# Altium PCB LSS-P-PCB-T v3.5.PcbDoc (part 3 of 5)
Units mil, origin at the board's own origin, x right, y up, seen from the top; angles counter-clockwise.
Board outline 2795.28 x 2795.28 mil, 4 copper layers (Top Layer, Power, Ground, Bottom Layer), stack 62.08 mil thick; 167 components, 123 nets, 589 pads, 650 vias.
Unrouted connection lines stored in the file: 2.
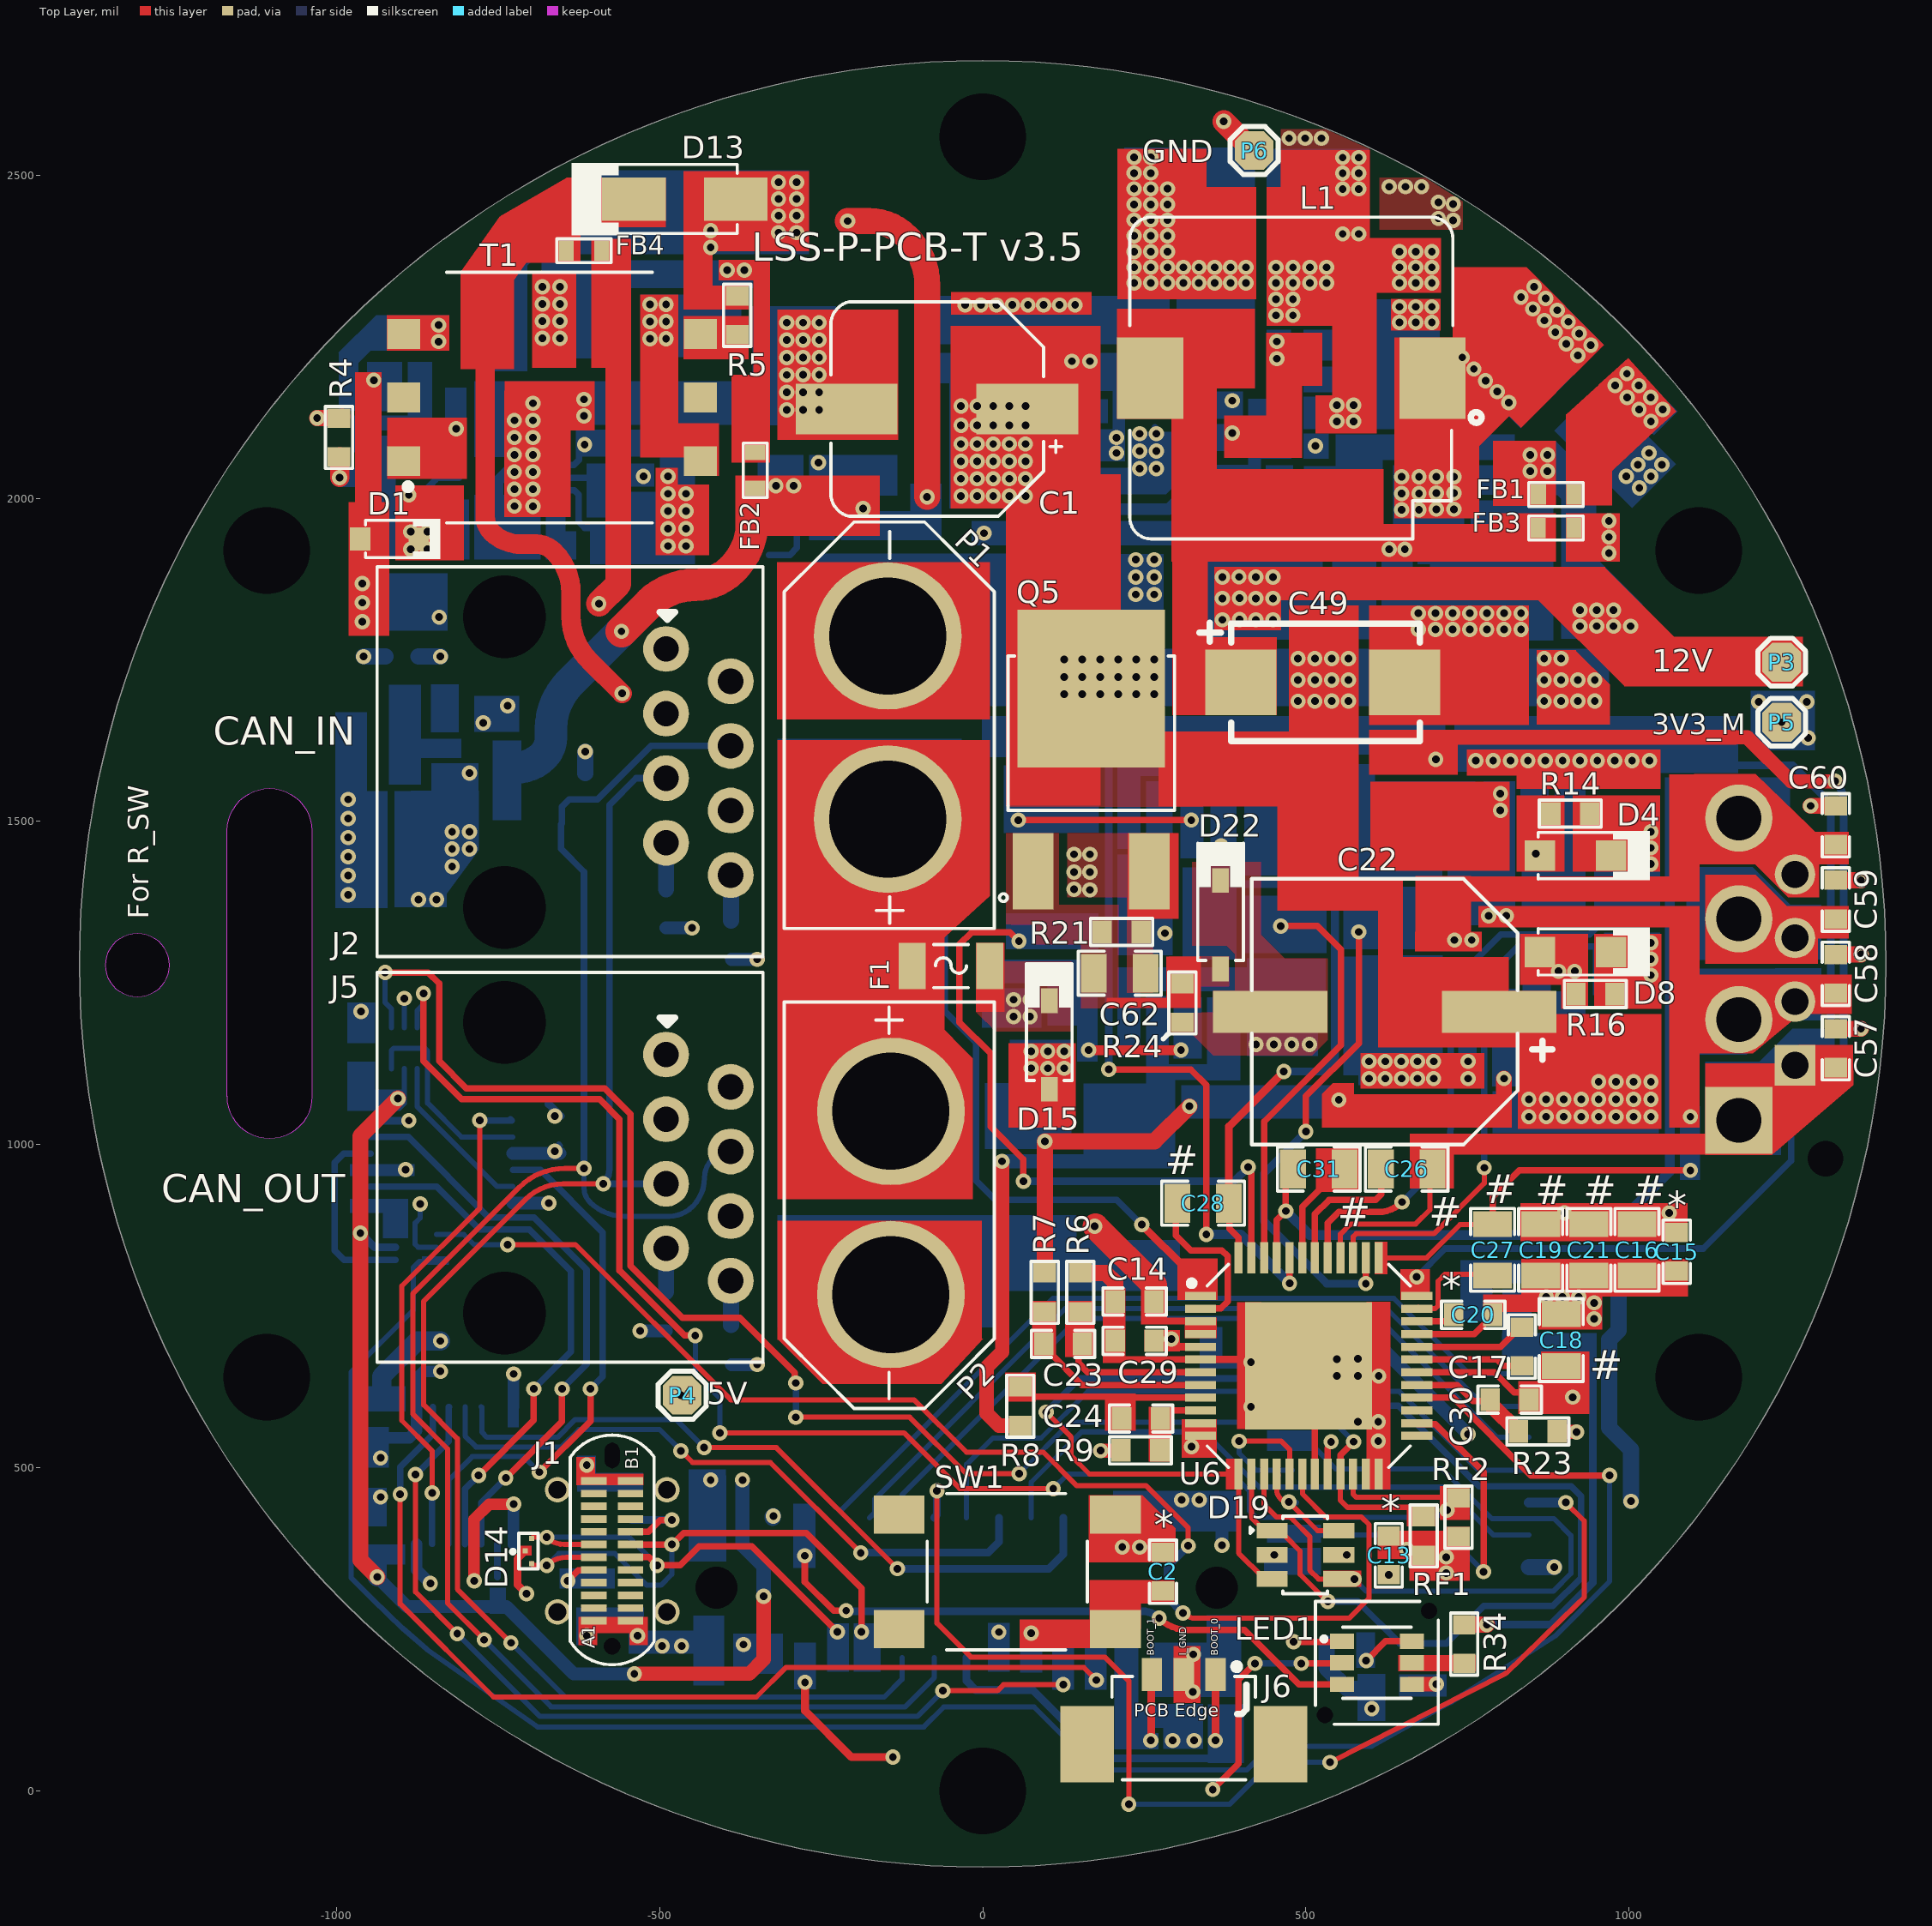
[diagram p0: Top Layer view]

## Part data (continued)
R3: library part RC0603FR-073K9L, "Res 0603 3.9K Ohm 1% 0.1W(1/10W) ±100ppm/°C Pad SMD T/R", Case Code (Imperial)=0603, Case Code (Metric)=1608, Manufacturer=Yageo, Max Operating Temperature=155°C, Max Power Dissipation=100mW, Min Operating Temperature=-55°C, Package Quantity=1, Resistance=3.9kR, Resistance Tolerance=1%, Resistor Type="Thick Film", Supplier Part Number 1=1995566P, Temperature Coefficient=100ppm/°C, Voltage Rating=50V, Case/Package=0603, Category="Chip SMD Resistors", ComponentLink1Description=https://datasheet.ciiva.com/11819/0900766b80f96399-11819346.pdf?src-supplier=RSComponents, ComponentLink1URL=https://datasheet.ciiva.com/11819/0900766b80f96399-11819346.pdf?src-supplier=RSComponents, ComponentLink2Description=https://datasheet.ciiva.com/2455/pyu-r-int-thick-7-2455362.pdf?src-supplier=Digi-Key, ComponentLink2URL=https://datasheet.ciiva.com/2455/pyu-r-int-thick-7-2455362.pdf?src-supplier=Digi-Key, ComponentLink3Description=https://datasheet.ciiva.com/2455/pyu-r-int-thick-7-2455363.pdf?src-supplier=Digi-Key, ComponentLink3URL=https://datasheet.ciiva.com/2455/pyu-r-int-thick-7-2455363.pdf?src-supplier=Digi-Key, ComponentLink4Description=https://datasheet.ciiva.com/2455/pyu-r-int-thick-7-2455364.pdf?src-supplier=Digi-Key, ComponentLink4URL=https://datasheet.ciiva.com/2455/pyu-r-int-thick-7-2455364.pdf?src-supplier=Digi-Key, ComponentLink5Description=https://datasheet.ciiva.com/7983/443971-7983640.pdf?src-supplier=Element14, ComponentLink5URL=https://datasheet.ciiva.com/7983/443971-7983640.pdf?src-supplier=Element14, ComponentLink6Description=https://datasheet.ciiva.com/12558/rc0603-272842-12558649.pdf?src-supplier=Mouser, ComponentLink6URL=https://datasheet.ciiva.com/12558/rc0603-272842-12558649.pdf?src-supplier=Mouser, ComponentLink7Description=https://datasheet.ciiva.com/7746/443971-7746347.pdf?src-supplier=Element14, ComponentLink7URL=https://datasheet.ciiva.com/7746/443971-7746347.pdf?src-supplier=Element14, ComponentLink8Description=https://datasheet.ciiva.com/7746/443971-7746348.pdf?src-supplier=Element14, ComponentLink8URL=https://datasheet.ciiva.com/7746/443971-7746348.pdf?src-supplier=Element14, ComponentLink9Description=https://datasheet.ciiva.com/15189/getdatasheetpartid-323794-15189725.pdf?src-supplier=Verical, ComponentLink9URL=https://datasheet.ciiva.com/15189/getdatasheetpartid-323794-15189725.pdf?src-supplier=Verical, Construction=Rectangular, Depth=0.8mm, Features="Moisture Resistant", Height=0.45mm, Lead Free="Lead Free", Length=1.6mm, Manufacturer Part Number=RC0603FR-073K9L, Military Standard=Not, Number of Pins=2, Number of Terminations=2, Packaging="Tape and Reel", Power Rating=100mW, Pricing 1="500=0.00600, 1000=0.00500, 2500=0.00500, 5000=0.00400 (GBP)", REACH SVHC="No SVHC", RoHS=Yes, RoHS Compliant=Yes, Series=RC, Size Code=0603, Stock 1=100, Supplier 1=RSComponents, Technology="THICK FILM", Termination=SMD/SMT, Tolerance=1%, Voltage Rating (DC)=50V, Width=0.8mm
R4: library part RS-03K7871FT, "100mW 50V ±1% ±100ppm/℃ -55℃~+155℃ 7.87kΩ 0603 Chip Resistor - Surface Mount ROHS", Manufacturer=FH, ComponentLink1Description=LCSC, ComponentLink1URL=https://lcsc.com/product-detail/Chip-span-style-background-color-ff0-Resistor-span-Surface-Mount_FH-Guangdong-Fenghua-Advanced-Tech-RS-03K7871FT_C322001.html, Manufacturer Part Number=RS-03K7871FT
R5 R11 R22 R25 R27 R32: library part RC0603FR-070RL, "RES SMD 0R, 1%, 0.1W, 0603", Case Code (Imperial)=0603, Case Code (Metric)=1608, Current Rating=1A, Manufacturer=Yageo, Max Operating Temperature=155°C, Max Power Dissipation=100mW, Min Operating Temperature=-55°C, Package Quantity=5000, Resistance=0mR, Resistor Type="Thick Film", Temperature Coefficient=200ppm/°C, Tolerance=1%, Voltage Rating=50V, Working Voltage=75V, Case/Package=0603, Category="Chip SMD Resistors", ComponentLink1Description=https://datasheet.ciiva.com/11808/0900766b80f96399-11808172.pdf?src-supplier=RSComponents, ComponentLink1URL=https://datasheet.ciiva.com/11808/0900766b80f96399-11808172.pdf?src-supplier=RSComponents, ComponentLink2Description=https://datasheet.ciiva.com/5558/rc0603-272842-5558341.pdf?src-supplier=Mouser, ComponentLink2URL=https://datasheet.ciiva.com/5558/rc0603-272842-5558341.pdf?src-supplier=Mouser, ComponentLink3Description=https://datasheet.ciiva.com/46382/443971-46382072.pdf?src-supplier=Element14, ComponentLink3URL=https://datasheet.ciiva.com/46382/443971-46382072.pdf?src-supplier=Element14, ComponentLink4Description=https://datasheet.ciiva.com/29721/pyu-r-int-thick-7-29721178.pdf?src-supplier=Digi-Key, ComponentLink4URL=https://datasheet.ciiva.com/29721/pyu-r-int-thick-7-29721178.pdf?src-supplier=Digi-Key, ComponentLink5Description=https://datasheet.ciiva.com/5684/443971-5684699.pdf?src-supplier=Farnell, ComponentLink5URL=https://datasheet.ciiva.com/5684/443971-5684699.pdf?src-supplier=Farnell, ComponentLink6Description=https://datasheet.ciiva.com/7983/443971-7983627.pdf?src-supplier=Element14, ComponentLink6URL=https://datasheet.ciiva.com/7983/443971-7983627.pdf?src-supplier=Element14, ComponentLink7Description=https://datasheet.ciiva.com/29721/pyu-rc0603-51-rohs-l-4-29721179.pdf?src-supplier=Digi-Key, ComponentLink7URL=https://datasheet.ciiva.com/29721/pyu-rc0603-51-rohs-l-4-29721179.pdf?src-supplier=Digi-Key, ComponentLink8Description=https://datasheet.ciiva.com/22643/1868787-22643388.pdf?src-supplier=Element14, ComponentLink8URL=https://datasheet.ciiva.com/22643/1868787-22643388.pdf?src-supplier=Element14, Contact Plating=Tin,Matte, Depth=0.8mm, Features="Moisture Resistant", Height=0.45mm, Lead Free="Lead Free", Length=1.6mm, Manufacturer Part Number=RC0603FR-070RL, Military Standard=Not, Number of Pins=2, Number of Terminations=2, Packaging="Tape and Reel", Power Rating=100mW, Pricing 1="5000=0.00320, 5000=0.00490, 50000=0.00450, 500000=0.00250, 2500000=0.00150 (USD)", Radiation Hardening=No, REACH SVHC="No SVHC", RoHS=Yes, Stock 1=1270000, Supplier 1="Arrow Electronics", Supplier Part Number 1=RC0603FR-070RL, Termination=SMD/SMT, Voltage Rating (DC)=50V, Width=0.031inch
R6 R7 R8 R9: library part RC0603FR-0747RL, "RES SMD 47OHM 0.1W 0603", Case Code (Imperial)=0603, Case Code (Metric)=1608, Manufacturer=Yageo, Max Operating Temperature=155°C, Max Power Dissipation=100mW, Min Operating Temperature=-55°C, Package Quantity=1, Resistance Tolerance=1%, Resistor Type="Thick Film", Supplier Part Number 1=311-47.0HRCT-ND, Temperature Coefficient=100ppm/°C, Voltage Rating=75V, Voltage Rating (DC)=50V, Case/Package=0603, Category="Chip SMD Resistors", ComponentLink1Description=https://datasheet.ciiva.com/2453/pyu-r-int-thick-7-2453922.pdf?src-supplier=Digi-Key, ComponentLink1URL=https://datasheet.ciiva.com/2453/pyu-r-int-thick-7-2453922.pdf?src-supplier=Digi-Key, ComponentLink2Description=https://datasheet.ciiva.com/2453/pyu-r-int-thick-7-2453923.pdf?src-supplier=Digi-Key, ComponentLink2URL=https://datasheet.ciiva.com/2453/pyu-r-int-thick-7-2453923.pdf?src-supplier=Digi-Key, ComponentLink3Description=https://datasheet.ciiva.com/2453/pyu-r-int-thick-7-2453924.pdf?src-supplier=Digi-Key, ComponentLink3URL=https://datasheet.ciiva.com/2453/pyu-r-int-thick-7-2453924.pdf?src-supplier=Digi-Key, ComponentLink4Description=https://datasheet.ciiva.com/7746/443971-7746363.pdf?src-supplier=Element14, ComponentLink4URL=https://datasheet.ciiva.com/7746/443971-7746363.pdf?src-supplier=Element14, ComponentLink5Description=https://datasheet.ciiva.com/7746/443971-7746364.pdf?src-supplier=Element14, ComponentLink5URL=https://datasheet.ciiva.com/7746/443971-7746364.pdf?src-supplier=Element14, ComponentLink6Description=https://datasheet.ciiva.com/46440/1868787-46440908.pdf?src-supplier=Element14, ComponentLink6URL=https://datasheet.ciiva.com/46440/1868787-46440908.pdf?src-supplier=Element14, Construction=Rectangular, Depth=0.8mm, Features="Moisture Resistant", Height=0.022inch, Lead Free="Lead Free", Length=1.6mm, Manufacturer Part Number=RC0603FR-0747RL, Military Standard=Not, Number of Pins=2, Number of Terminations=2, Packaging="Tape and Reel", Power Rating=100mW, Pricing 1="1=0.10000, 10=0.02400, 100=0.00970, 1000=0.00436, 2500=0.00378 (USD)", REACH SVHC=Unknown, Resistance=47R, RoHS=Yes, RoHS Compliant=Yes, Series=RC, Size Code=0603, Stock 1=596562, Supplier 1=Digi-Key, Termination=SMD/SMT, Tolerance=1%, Weight=7.1E-05oz, Width=0.8mm
R10: library part RC0201FR-074K7L, "RES SMD 4.7K OHM 1% 1/20W 0201", Case Code (Imperial)=0201, Case Code (Metric)=0603, Manufacturer=Yageo, Max Operating Temperature=125°C, Max Power Dissipation=50mW, Min Operating Temperature=-55°C, Package Quantity=1, Resistance=4.7kR, Supplier Part Number 1=311-4.70KMCT-ND, Temperature Coefficient=200ppm/°C, Tolerance=1%, Voltage Rating=25V, Case/Package=0201, ComponentLink1Description=http://www.yageo.com/documents/recent/PYu-RC_Group_51_RoHS_L_10.pdf?src-supplier=Digi-Key, ComponentLink1URL=http://www.yageo.com/documents/recent/PYu-RC_Group_51_RoHS_L_10.pdf?src-supplier=Digi-Key, ComponentLink2Description=http://www.farnell.com/datasheets/2167052.pdf?src-supplier=Element14, ComponentLink2URL=http://www.farnell.com/datasheets/2167052.pdf?src-supplier=Element14, ComponentLink3Description=http://www.yageo.com/documents/recent/PYu-RC0201_51_RoHS_L_8.pdf?src-supplier=Avnet+Europe, ComponentLink3URL=http://www.yageo.com/documents/recent/PYu-RC0201_51_RoHS_L_8.pdf?src-supplier=Avnet+Europe, ComponentLink4Description=http://www.yageo.com/documents/recent/PYu-RC0201_51_RoHS_L_8.pdf?src-supplier=Avnet, ComponentLink4URL=http://www.yageo.com/documents/recent/PYu-RC0201_51_RoHS_L_8.pdf?src-supplier=Avnet, Composition="Thick Film", Contact Plating=Tin,Matte, Depth=0.3mm, Features="Moisture Resistant", Height=0.01inch, Lead Free="Lead Free", Length=0.6mm, Manufacturer Part Number=RC0201FR-074K7L, Military Standard=Not, Number of Terminations=2, Packaging="Tape and Reel", Power Rating=50mW, Pricing 1="1=0.1, 10=0.04, 100=0.0165, 1000=0.00739, 2500=0.00642, 5000=0.0053 (USD)", Radiation Hardening=No, REACH SVHC=Unknown, Stock 1=2128413, Supplier 1=Digi-Key, Termination=SMD/SMT, Weight=6E-06oz, Width=0.012inch
R12 R13: library part CRH2512FR050E04Z, "2W 50mΩ ±1% 2512 Current Sense Resistors/Shunt Resistors ROHS", LCSC Part Number=C176035, Manufacturer="Ever Ohms Tech", Package=2512, ComponentLink1Description=LCSC, ComponentLink1URL=https://www.lcsc.com/product-detail/Current-Sense-Resistors-Shunt-Resistors_Ever-Ohms-Tech-CRH2512FR050E04Z_C176035.html, Item Type=Resistor, Manufacturer Part Number=CRH2512FR050E04Z
R14 R15 R16 R17 R18 R19 R20 R26: library part 0603WAF220JT5E, "22Ω 0603 Chip Resistor - Surface Mount ROHS", Manufacturer=UNI-ROYAL, ComponentLink1Description=LCSC, ComponentLink1URL=https://www.lcsc.com/product-detail/Chip-Resistor-Surface-Mount_UNI-ROYAL-Uniroyal-Elec-0603WAF220JT5E_C23345.html, Manufacturer Part Number=0603WAF220JT5E
R21: library part RC0603FR-0724K9L, "RES 24.9K OHM 1% 1/10W 0603", LCSC Part Number=C137761, Manufacturer=Yageo, Supplier Part Number=3435880, Voltage Rating (DC)=50V, ComponentLink1Description=https://datasheet.ciiva.com/15189/getdatasheetpartid-327910-15189670.pdf?src-supplier=Verical, ComponentLink1URL=https://datasheet.ciiva.com/15189/getdatasheetpartid-327910-15189670.pdf?src-supplier=Verical, ComponentLink2Description=https://datasheet.ciiva.com/2453/pyu-r-int-thick-7-2453985.pdf?src-supplier=Digikey, ComponentLink2URL=https://datasheet.ciiva.com/2453/pyu-r-int-thick-7-2453985.pdf?src-supplier=Digikey, ComponentLink3Description=https://datasheet.ciiva.com/2453/pyu-r-int-thick-7-2453986.pdf?src-supplier=Digikey, ComponentLink3URL=https://datasheet.ciiva.com/2453/pyu-r-int-thick-7-2453986.pdf?src-supplier=Digikey, ComponentLink4Description=https://datasheet.ciiva.com/2453/pyu-r-int-thick-7-2453987.pdf?src-supplier=Digikey, ComponentLink4URL=https://datasheet.ciiva.com/2453/pyu-r-int-thick-7-2453987.pdf?src-supplier=Digikey, Item Type=Resistor, Lead Free=5697LeadFree, Manufacturer Part Number=RC0603FR-0724K9L, Pricing="5000=0.0015, 50000=0.0014, 150000=0.0014, 375000=0.0013, 1000000=0.0012 (USD)", RoHS=Yes, Stock=195000, Supplier="Future Electronics"
R23: library part ERJ3GEYJ2R2V, "RES SMD 2.2OHM 0603", Case Code (Imperial)=0603, Case Code (Metric)=1608, Manufacturer=Panasonic, Manufacturer Part Number=ERJ-3GEYJ2R2V, Max Operating Temperature=155°C, Max Power Dissipation=100mW, Min Operating Temperature=-55°C, Package Quantity=1, Resistance=2.2R, Resistance Tolerance=5%, Resistor Type="Thick Film", Supplier Part Number 1=P2.2GCT-ND, Temperature Coefficient=600ppm/°C, Voltage Rating=75V, Voltage Rating (DC)=50V, Case/Package=0603, Category="Chip SMD Resistors", ComponentLink1Description=https://datasheet.ciiva.com/11821/0900766b80f806dd-11821449.pdf?src-supplier=RSComponents, ComponentLink1URL=https://datasheet.ciiva.com/11821/0900766b80f806dd-11821449.pdf?src-supplier=RSComponents, ComponentLink2Description=https://datasheet.ciiva.com/46374/1500035-46374005.pdf?src-supplier=Element14, ComponentLink2URL=https://datasheet.ciiva.com/46374/1500035-46374005.pdf?src-supplier=Element14, ComponentLink3Description=https://datasheet.ciiva.com/9117/aoa0000ce1-9117159.pdf?src-supplier=Avnet, ComponentLink3URL=https://datasheet.ciiva.com/9117/aoa0000ce1-9117159.pdf?src-supplier=Avnet, ComponentLink4Description=https://datasheet.ciiva.com/24025/aoa0000ce1-37422-24025463.pdf?src-supplier=Mouser, ComponentLink4URL=https://datasheet.ciiva.com/24025/aoa0000ce1-37422-24025463.pdf?src-supplier=Mouser, ComponentLink5Description=https://datasheet.ciiva.com/16765/70255313-16765018.pdf?src-supplier=Allied+Electronics, ComponentLink5URL=https://datasheet.ciiva.com/16765/70255313-16765018.pdf?src-supplier=Allied+Electronics, ComponentLink6Description=https://datasheet.ciiva.com/30150/4aoa0000ce1-30150090.pdf?src-supplier=Onlinecomponents.com, ComponentLink6URL=https://datasheet.ciiva.com/30150/4aoa0000ce1-30150090.pdf?src-supplier=Onlinecomponents.com, ComponentLink7Description=https://datasheet.ciiva.com/46386/1500035-46386764.pdf?src-supplier=Element14, ComponentLink7URL=https://datasheet.ciiva.com/46386/1500035-46386764.pdf?src-supplier=Element14, ComponentLink8Description=https://datasheet.ciiva.com/16762/70255313-16762317.pdf?src-supplier=Allied+Electronics, ComponentLink8URL=https://datasheet.ciiva.com/16762/70255313-16762317.pdf?src-supplier=Allied+Electronics, ComponentLink9Description=https://datasheet.ciiva.com/17214/aoa0000ce1-17214157.pdf?src-supplier=Avnet+Europe, ComponentLink9URL=https://datasheet.ciiva.com/17214/aoa0000ce1-17214157.pdf?src-supplier=Avnet+Europe, Construction=Rectangular, Contact Plating=Tin, Depth=0.8mm, Features="Automotive AEC-Q200", Height=0.45mm, Lead Free="Lead Free", Length=1.6mm, Military Standard=Not, Mount="Surface Mount", Number of Terminations=2, Packaging="Tape and Reel", Power Rating=100mW, Pricing 1="1=0.10000, 10=0.05000, 100=0.02020, 1000=0.00905, 2500=0.00786 (USD)", Radiation Hardening=No, REACH SVHC="No SVHC", RoHS=Yes, RoHS Compliant=Yes, Series=ERJ, Stock 1=2941010, Supplier 1=Digi-Key, Technology="THICK FILM", Termination=SMD/SMT, Tolerance=5%, Width=0.8mm
R24: library part RC0603FR-0720KL, "RES 20K OHM 1% 1/10W 0603", Case Code (Imperial)=0603, Case Code (Metric)=1608, LCSC Part Number=C105575, Manufacturer=Yageo, Max Operating Temperature=155°C, Max Power Dissipation=100mW, Min Operating Temperature=-55°C, Package Quantity=1, Resistance Tolerance=1%, Resistor Type="Thick Film", Supplier Part Number=311-20.0KHRCT-ND, Temperature Coefficient=100ppm/°C, Voltage Rating=50V, Case/Package=0603, Category="Chip SMD Resistors", ComponentLink1Description=https://datasheet.ciiva.com/11808/0900766b80f96399-11808275.pdf?src-supplier=Rs, ComponentLink1URL=https://datasheet.ciiva.com/11808/0900766b80f96399-11808275.pdf?src-supplier=Rs, ComponentLink2Description=https://datasheet.ciiva.com/22747/443971-22747525.pdf?src-supplier=Element14, ComponentLink2URL=https://datasheet.ciiva.com/22747/443971-22747525.pdf?src-supplier=Element14, ComponentLink3Description=https://datasheet.ciiva.com/2453/pyu-r-int-thick-7-2453911.pdf?src-supplier=Digikey, ComponentLink3URL=https://datasheet.ciiva.com/2453/pyu-r-int-thick-7-2453911.pdf?src-supplier=Digikey, ComponentLink4Description=https://datasheet.ciiva.com/2453/pyu-r-int-thick-7-2453912.pdf?src-supplier=Digikey, ComponentLink4URL=https://datasheet.ciiva.com/2453/pyu-r-int-thick-7-2453912.pdf?src-supplier=Digikey, ComponentLink5Description=https://datasheet.ciiva.com/2453/pyu-r-int-thick-7-2453910.pdf?src-supplier=Digikey, ComponentLink5URL=https://datasheet.ciiva.com/2453/pyu-r-int-thick-7-2453910.pdf?src-supplier=Digikey, Construction=Rectangular, Depth=0.8mm, Features="Moisture Resistant", Height=0.022inch, Item Type=Resistor, Lead Free=5697LeadFree, Length=0.063inch, Manufacturer Part Number=RC0603FR-0720KL, Military Standard=Not, Number of Terminations=2, Packaging="Tape and Reel", Pins=2NUMBER, Power Rating=100mW, Pricing="1=0.1, 10=0.019, 50=0.0112, 100=0.0093, 500=0.00622, 1000=0.00532 (USD)", Reach SVHC Compliant=No, RoHS=Yes, RoHS Compliant=Yes, Series=RC, Stock=4327430, Supplier=Digikey, Technology="THICK FILM", Termination=SMD/SMT, Tolerance=1%, Voltage Rating (DC)=50V, Width=0.031inch
R29: library part RT0603FRE07127KL, "RES SMD 127K OHM 1% 1/10W 0603", Case Code (Imperial)=0603, Case Code (Metric)=1608, Manufacturer=Yageo, Max Operating Temperature=125°C, Max Power Dissipation=100mW, Min Operating Temperature=-55°C, Package Quantity=5000, Resistance=127kR, Resistor Type="Thin Film", Supplier Part Number 1=603-RT0603FRE07127KL, Temperature Coefficient=50ppm/°C, Tolerance=1%, Voltage Rating=75V, Voltage Rating (DC)=50V, Case/Package=0603, Category="Chip SMD Resistors", ComponentLink1Description=https://datasheet.ciiva.com/2559/pyu-rt-1-to-0-05-rohs-l-5-2559509.pdf?src-supplier=Digi-Key, ComponentLink1URL=https://datasheet.ciiva.com/2559/pyu-rt-1-to-0-05-rohs-l-5-2559509.pdf?src-supplier=Digi-Key, Height=0.022inch, Lead Free="Lead Free", Length=0.063inch, Manufacturer Part Number=RT0603FRE07127KL, Number of Terminations=2, Packaging="Tape and Reel", Power Rating=100mW, Pricing 1="1=0.19000, 10=0.05700, 50=0.05700, 100=0.02300, 1000=0.01100, 10000=0.00700 (USD)", RoHS=Yes, RoHS Compliant=Yes, Series=RT, Stock 1=7346, Supplier 1=Mouser, Termination=SMD/SMT, Width=0.031inch
R30 R31: library part RC0603JR-07100KL, "Res Thick Film 0603 100K Ohm 5% 1/10W 100ppm/C Molded SMD SMD Paper T/R", Case Code (Imperial)=0603, Case Code (Metric)=1608, Manufacturer=Yageo, Max Operating Temperature=155°C, Max Power Dissipation=100mW, Min Operating Temperature=-55°C, Resistance=100kR, Resistance Tolerance=5%, Resistor Type="Thick Film", Supplier Part Number 1=311-100KGRCT-ND, Temperature Coefficient=100ppm/°C, Voltage Rating=50V, Case/Package=0603, Category="Chip SMD Resistors", ComponentLink1Description=https://datasheet.ciiva.com/7746/443971-7746424.pdf?src-supplier=Element14, ComponentLink1URL=https://datasheet.ciiva.com/7746/443971-7746424.pdf?src-supplier=Element14, ComponentLink2Description=https://datasheet.ciiva.com/7983/443971-7983686.pdf?src-supplier=Element14, ComponentLink2URL=https://datasheet.ciiva.com/7983/443971-7983686.pdf?src-supplier=Element14, ComponentLink3Description=https://datasheet.ciiva.com/7746/443971-7746423.pdf?src-supplier=Element14, ComponentLink3URL=https://datasheet.ciiva.com/7746/443971-7746423.pdf?src-supplier=Element14, ComponentLink4Description=https://datasheet.ciiva.com/8887/pyu-rc0603-51-rohs-l-4-8887903.pdf?src-supplier=Avnet, ComponentLink4URL=https://datasheet.ciiva.com/8887/pyu-rc0603-51-rohs-l-4-8887903.pdf?src-supplier=Avnet, Contact Plating=Tin,Matte, Features="Moisture Resistant", Lead Free="Lead Free", Manufacturer Part Number=RC0603JR-07100KL, Number of Pins=2, Number of Terminations=2, Packaging="Tape and Reel", Power Rating=100mW, Pricing 1="1=0.10000, 10=0.02000, 100=0.00800, 1000=0.00360, 2500=0.00312 (USD)", Radiation Hardening=No, REACH SVHC="No SVHC", RoHS=Yes, RoHS Compliant=Yes, Series=RC, Size Code=0603, Stock 1=1210037, Supplier 1=Digi-Key, Termination=SMD/SMT, Tolerance=5%, Voltage Rating (DC)=50V, Width=0.8mm
R33 R46: library part RC0603FR-0751RL, "RES SMD 51R 100mW 0603", Case Code (Imperial)=0603, Case Code (Metric)=1608, Manufacturer=Yageo, Max Operating Temperature=155°C, Max Power Dissipation=100mW, Min Operating Temperature=-55°C, Package Quantity=1, Resistance Tolerance=1%, Resistor Type="Thick Film", Temperature Coefficient=100ppm/°C, Voltage Rating=75V, Voltage Rating (DC)=50V, Case/Package=0603, Category="Chip SMD Resistors", ComponentLink1Description=https://datasheet.ciiva.com/11808/0900766b80f96399-11808142.pdf?src-supplier=RSComponents, ComponentLink1URL=https://datasheet.ciiva.com/11808/0900766b80f96399-11808142.pdf?src-supplier=RSComponents, ComponentLink2Description=https://datasheet.ciiva.com/46395/443971-46395015.pdf?src-supplier=Element14, ComponentLink2URL=https://datasheet.ciiva.com/46395/443971-46395015.pdf?src-supplier=Element14, ComponentLink3Description=https://datasheet.ciiva.com/2454/pyu-r-int-thick-7-2454445.pdf?src-supplier=Digi-Key, ComponentLink3URL=https://datasheet.ciiva.com/2454/pyu-r-int-thick-7-2454445.pdf?src-supplier=Digi-Key, ComponentLink4Description=https://datasheet.ciiva.com/2454/pyu-r-int-thick-7-2454446.pdf?src-supplier=Digi-Key, ComponentLink4URL=https://datasheet.ciiva.com/2454/pyu-r-int-thick-7-2454446.pdf?src-supplier=Digi-Key, ComponentLink5Description=https://datasheet.ciiva.com/2454/pyu-r-int-thick-7-2454444.pdf?src-supplier=Digi-Key, ComponentLink5URL=https://datasheet.ciiva.com/2454/pyu-r-int-thick-7-2454444.pdf?src-supplier=Digi-Key, Contact Plating=Tin,Matte, Depth=0.8mm, Features="Moisture Resistant", Height=0.45mm, Lead Free="Lead Free", Length=1.6mm, Manufacturer Part Number=RC0603FR-0751RL, Number of Terminations=2, Packaging="Tape and Reel", Power Rating=100mW, Pricing 1="5000=0.00260, 10000=0.00240, 25000=0.00210, 50000=0.00180 (USD)", REACH SVHC="No SVHC", Resistance=51R, RoHS=Yes, RoHS Compliant=Yes, Series=RC, Size Code=0603, Stock 1=70000, Supplier 1="Arrow Electronics", Supplier Part Number 1=RC0603FR-0751RL, Technology="THICK FILM", Termination=SMD/SMT, Tolerance=1%, Weight=7.1E-05oz, Width=0.8mm
R34: library part RC0603FR-07150RL, "RES SMD 150OHM 1/10W 0603", Case Code (Imperial)=0603, Case Code (Metric)=1608, Manufacturer=Yageo, Max Operating Temperature=155°C, Max Power Dissipation=100mW, Min Operating Temperature=-55°C, Package Quantity=5000, Resistance Tolerance=1%, Resistor Type="Thick Film", Supplier Part Number 1=311-150HRCT-ND, Temperature Coefficient=100ppm/°C, Voltage Rating=50V, Case/Package=0603, Category="Chip SMD Resistors", ComponentLink1Description=https://datasheet.ciiva.com/46412/443971-46412844.pdf?src-supplier=Element14, ComponentLink1URL=https://datasheet.ciiva.com/46412/443971-46412844.pdf?src-supplier=Element14, ComponentLink2Description=https://datasheet.ciiva.com/46440/1868787-46440893.pdf?src-supplier=Element14, ComponentLink2URL=https://datasheet.ciiva.com/46440/1868787-46440893.pdf?src-supplier=Element14, ComponentLink3Description=https://datasheet.ciiva.com/12555/rc0603-272842-12555301.pdf?src-supplier=Mouser, ComponentLink3URL=https://datasheet.ciiva.com/12555/rc0603-272842-12555301.pdf?src-supplier=Mouser, Construction=Rectangular, Depth=0.8mm, Features="Moisture Resistant", Height=0.45mm, Lead Free="Lead Free", Length=1.6mm, Manufacturer Part Number=RC0603FR-07150RL, Military Standard=Not, Number of Pins=2, Number of Terminations=2, Packaging="Tape and Reel", Power Rating=100mW, Pricing 1="1=0.10000, 10=0.02400, 100=0.00970, 1000=0.00436, 2500=0.00378 (USD)", REACH SVHC="No SVHC", Resistance=150R, RoHS=Yes, RoHS Compliant=Yes, Series=RC, Size Code=0603, Stock 1=263721, Supplier 1=Digi-Key, Termination=SMD/SMT, Tolerance=1%, Voltage Rating (DC)=50V, Width=0.8mm
R35 R39: library part RC0603FR-072KL, "RES SMD 2K OHM 1% 1/10W 0603", Case Code (Imperial)=0603, Case Code (Metric)=1608, Manufacturer=Yageo, Max Operating Temperature=155°C, Max Power Dissipation=100mW, Min Operating Temperature=-55°C, Package Quantity=1, Resistance=2kR, Supplier Part Number 1=311-2.00KHRCT-ND, Temperature Coefficient=100ppm/°C, Tolerance=1%, Voltage Rating=50V, Working Voltage=75V, Case/Package=0603, ComponentLink1Description=http://www.farnell.com/datasheets/2167052.pdf?src-supplier=Element14, ComponentLink1URL=http://www.farnell.com/datasheets/2167052.pdf?src-supplier=Element14, ComponentLink2Description=http://documents.rs-components.com/techlib://itc_doclist_GB.htm?stockno=5050139&src-supplier=RSComponents, ComponentLink2URL=http://documents.rs-components.com/techlib://itc_doclist_GB.htm?stockno=5050139&src-supplier=RSComponents, ComponentLink3Description=http://www.yageo.com/documents/recent/PYu-RC_Group_51_RoHS_L_10.pdf?src-supplier=Digi-Key, ComponentLink3URL=http://www.yageo.com/documents/recent/PYu-RC_Group_51_RoHS_L_10.pdf?src-supplier=Digi-Key, ComponentLink4Description=http://www.mouser.com/catalog/specsheets/RC0603.pdf?src-supplier=Mouser, ComponentLink4URL=http://www.mouser.com/catalog/specsheets/RC0603.pdf?src-supplier=Mouser, Composition="Thick Film", Depth=0.8mm, Features="Moisture Resistant", Height=0.45mm, Lead Free="Lead Free", Length=1.6mm, Manufacturer Part Number=RC0603FR-072KL, Military Standard=Not, Number of Pins=2, Number of Terminations=2, Packaging="Tape and Reel", Power Rating=100mW, Pricing 1="1=0.1, 10=0.023, 100=0.0094, 1000=0.00421, 2500=0.00366 (USD)", REACH SVHC="No SVHC", Stock 1=8782961, Supplier 1=Digi-Key, Termination=SMD/SMT, Voltage Rating (DC)=50V, Width=0.031inch
R36: library part ERA3AEB5112V, "Res SMD 0603 51.1K Ohm 0.1% 1/10W", Case Code (Imperial)=0603, Case Code (Metric)=1608, Manufacturer=Panasonic, Manufacturer Part Number=ERA-3AEB5112V, Max Operating Temperature=155°C, Max Power Dissipation=100mW, Min Operating Temperature=-55°C, Package Quantity=5000, Resistance=51.1kR, Resistor Type="Thin Film,Metal Film", Supplier Part Number 1=4064227, Temperature Coefficient=25ppm/°C, Tolerance=0.1%, Voltage Rating=150V, Voltage Rating (DC)=75V, Case/Package=0603, Category="Chip SMD Resistors", ComponentLink1Description=https://datasheet.ciiva.com/11810/0900766b80eb1d8c-11810561.pdf?src-supplier=RSComponents, ComponentLink1URL=https://datasheet.ciiva.com/11810/0900766b80eb1d8c-11810561.pdf?src-supplier=RSComponents, ComponentLink2Description=https://datasheet.ciiva.com/30178/54aoa0000ce26-30178106.pdf?src-supplier=Onlinecomponents.com, ComponentLink2URL=https://datasheet.ciiva.com/30178/54aoa0000ce26-30178106.pdf?src-supplier=Onlinecomponents.com, ComponentLink3Description=https://datasheet.ciiva.com/9189/aoa0000ce26-9189019.pdf?src-supplier=Avnet, ComponentLink3URL=https://datasheet.ciiva.com/9189/aoa0000ce26-9189019.pdf?src-supplier=Avnet, ComponentLink4Description=https://datasheet.ciiva.com/5968/485442-5968877.pdf?src-supplier=Farnell, ComponentLink4URL=https://datasheet.ciiva.com/5968/485442-5968877.pdf?src-supplier=Farnell, ComponentLink5Description=https://datasheet.ciiva.com/7861/485442-7861694.pdf?src-supplier=Element14, ComponentLink5URL=https://datasheet.ciiva.com/7861/485442-7861694.pdf?src-supplier=Element14, ComponentLink6Description=https://datasheet.ciiva.com/5968/485442-5968879.pdf?src-supplier=Farnell, ComponentLink6URL=https://datasheet.ciiva.com/5968/485442-5968879.pdf?src-supplier=Farnell, ComponentLink7Description=https://datasheet.ciiva.com/7861/485442-7861695.pdf?src-supplier=Element14, ComponentLink7URL=https://datasheet.ciiva.com/7861/485442-7861695.pdf?src-supplier=Element14, ComponentLink8Description=https://datasheet.ciiva.com/41450/001180914-da-01-en-widerstand-era-0603-51k1-0-1-5000st-41450231.pdf?src-supplier=Conrad, ComponentLink8URL=https://datasheet.ciiva.com/41450/001180914-da-01-en-widerstand-era-0603-51k1-0-1-5000st-41450231.pdf?src-supplier=Conrad, Contact Plating=Tin, Depth=0.8mm, Features="Automotive AEC-Q200", Height=0.45mm, Lead Free="Lead Free", Length=1.6mm, Military Standard=Not, Mount="Surface Mount", Number of Pins=2, Number of Terminations=2, Packaging="Tape and Reel", Power Rating=100mW, Pricing 1="5000=0.04010, 10000=0.03280, 15000=0.03250, 20000=0.03230, 25000=0.03210 (USD)", Radiation Hardening=No, RoHS=Yes, Stock 1=5000, Supplier 1="Future Electronics", Width=0.8mm
R37: library part 0603WAD1103T5E, "110kΩ 0603 Chip Resistor - Surface Mount ROHS", Manufacturer=UNI-ROYAL, ComponentLink1Description=LCSC, ComponentLink1URL=https://www.lcsc.com/product-detail/Chip-Resistor-Surface-Mount_UNI-ROYAL-Uniroyal-Elec-0603WAD1103T5E_C423090.html, Manufacturer Part Number=0603WAD1103T5E
R38 RF1 RF2 RF3 RF4 RF5: library part RC0603FR-0710KL, "RES SMD 10K Ohm 1% 1/10W 0603", Case Code (Imperial)=0603, Case Code (Metric)=1608, Manufacturer=Yageo, Max Operating Temperature=155°C, Max Power Dissipation=100mW, Min Operating Temperature=-55°C, Resistance=10kR, Resistance Tolerance=1%, Resistor Type="Thick Film", Supplier Part Number 1=311-10.0KHRCT-ND, Temperature Coefficient=100ppm/°C, Voltage Rating=75V, Voltage Rating (DC)=50V, Case/Package=0603, Category="Chip SMD Resistors", ComponentLink1Description=https://datasheet.ciiva.com/7660/38590-7660789.pdf?src-supplier=Element14, ComponentLink1URL=https://datasheet.ciiva.com/7660/38590-7660789.pdf?src-supplier=Element14, ComponentLink2Description=https://datasheet.ciiva.com/7983/443971-7983596.pdf?src-supplier=Element14, ComponentLink2URL=https://datasheet.ciiva.com/7983/443971-7983596.pdf?src-supplier=Element14, ComponentLink3Description=https://datasheet.ciiva.com/22747/443971-22747519.pdf?src-supplier=Element14, ComponentLink3URL=https://datasheet.ciiva.com/22747/443971-22747519.pdf?src-supplier=Element14, ComponentLink4Description=https://datasheet.ciiva.com/46440/1868787-46440891.pdf?src-supplier=Element14, ComponentLink4URL=https://datasheet.ciiva.com/46440/1868787-46440891.pdf?src-supplier=Element14, ComponentLink5Description=https://datasheet.ciiva.com/7746/1738695-7746239.pdf?src-supplier=Element14, ComponentLink5URL=https://datasheet.ciiva.com/7746/1738695-7746239.pdf?src-supplier=Element14, ComponentLink6Description=https://datasheet.ciiva.com/15189/getdatasheetpartid-409289-15189591.pdf?src-supplier=Verical, ComponentLink6URL=https://datasheet.ciiva.com/15189/getdatasheetpartid-409289-15189591.pdf?src-supplier=Verical, Construction=Rectangular, Depth=0.8mm, Features="Moisture Resistant", Height=0.45mm, Lead Free="Lead Free", Lead Pitch=0.3mm, Length=1.6mm, Manufacturer Part Number=RC0603FR-0710KL, Military Standard=Not, Number of Pins=2, Number of Terminations=2, Packaging="Tape and Reel", Power Rating=100mW, Pricing 1="1=0.10000, 10=0.02400, 100=0.00970, 1000=0.00436, 2500=0.00378 (USD)", REACH SVHC=Unknown, RoHS=Yes, RoHS Compliant=Yes, Series=RC, Size Code=0603, Stock 1=25249139, Supplier 1=Digi-Key, Termination=SMD/SMT, Tolerance=1%, Weight=7.1E-05oz, Width=0.8mm
R40: library part 0603WAF1201T5E, "±1% 1/10W Thick Film Resistors 75V ±100ppm/℃ -55℃~+155℃ 1.2kΩ 0603 Chip Resistor - Surface Mount ROHS", Manufacturer=UNI-ROYAL, Package=0603, Manufacturer Part No=0603WAF1201T5E
R41: library part RTT03R330FTP, "±1% 1/10W Thick Film Resistors 75V ±600ppm/℃ -55℃~+155℃ 0.33Ω 0603 Chip Resistor - Surface Mount ROHS", Manufacturer=RALEC, Package=0603, Manufacturer Part No=RTT03R330FTP
SW1: "Memontary Tactile Push Button Switch 6X6X4.3 / 4.5 / 5/6/7/8/9/10 / 13mm SMD", Manufacturer="WIN ELEC-TECH CO., LTD", Manufacturer Part No=Custum, Package=Custom, Link=https://pl.aliexpress.com/item/4001356961226.html?spm=a2g0o.productlist.0.0.7081462a6lheLU&algo_pvid=c376c5b0-041a-41a5-8550-ffd48044eb94&algo_exp_id=c376c5b0-041a-41a5-8550-ffd48044eb94-0
T1: "XFRMR ISOL BUCK DC/DC CONV SMD", Frequency=150kHz, Manufacturer="Wurth Electronics Midcom", Max Operating Temperature=125°C, Min Operating Temperature=-40°C, Supplier Part Number 1=1297-1165-1-ND, Category="Power Supply Modules", ComponentLink1Description=http://www.mouser.com/ds/2/445/750314597-773587.pdf?src-supplier=Mouser, ComponentLink1URL=http://www.mouser.com/ds/2/445/750314597-773587.pdf?src-supplier=Mouser, ComponentLink2Description=https://katalog.we-online.de/ctm/datasheet/750314597.pdf?src-supplier=Digi-Key, ComponentLink2URL=https://katalog.we-online.de/ctm/datasheet/750314597.pdf?src-supplier=Digi-Key, Manufacturer Part Number=750314597, Mount="Surface Mount", Packaging="Tape and Reel", Pricing 1="1=3.57000, 10=3.30600, 50=3.00500, 100=2.73200 (USD)", RoHS=Yes, RoHS Compliant=No, Stock 1=1132, Supplier 1=Digi-Key
U1: "IC REG BUCK FLYBCK ADJ 12WSON", Manufacturer="Texas Instruments", Max Input Voltage=65V, Max Operating Temperature=125°C, Max Output Voltage=60V, Min Input Voltage=4.5V, Min Operating Temperature=-40°C, Min Output Voltage=2V, Output Current=1.5A, Quiescent Current=2.3mA, Supplier Part Number 1=296-46121-6-ND, Switching Frequency=1MHz, Category="Power Supply Modules", ComponentLink1Description=http://www.ti.com/lit/ds/symlink/lm5160a.pdf?src-supplier=Digi-Key, ComponentLink1URL=http://www.ti.com/lit/ds/symlink/lm5160a.pdf?src-supplier=Digi-Key, ComponentLink2Description=http://www.ti.com/general/docs/suppproductinfo.tsp?distId=10&amp;gotoUrl=http%3A%2F%2Fwww.ti.com%2Flit%2Fgpn%2Flm5160a&src-supplier=Digi-Key, ComponentLink2URL=http://www.ti.com/general/docs/suppproductinfo.tsp?distId=10&amp;gotoUrl=http%3A%2F%2Fwww.ti.com%2Flit%2Fgpn%2Flm5160a&src-supplier=Digi-Key, Lead Free="Lead Free", Manufacturer Part Number=LM5160ADNTR, Mount="Surface Mount", Number of Outputs=1, Output Type=Adjustable, Packaging="Tape and Reel", Pricing 1="1=5.87000, 10=5.27300, 25=4.98480, 100=4.32000, 250=4.09848, 500=3.67756 (USD)", RoHS=Yes, RoHS Compliant=Yes, Supplier 1=Digi-Key, Synchronous Rectifier=Yes, Topology=Flyback
U2: "IC REG BUCK 3.3V 2A TSOT26", LCSC Part Number=C780769, Manufacturer=Diodes, Supplier Part Number=6109504, Category="Voltage Regulators - Switching", ComponentLink1Description=https://www.diodes.com/assets/Datasheets/AP63200-AP63201-AP63203-AP63205.pdf?src-supplier=Digi-Key, ComponentLink1URL=https://www.diodes.com/assets/Datasheets/AP63200-AP63201-AP63203-AP63205.pdf?src-supplier=Digi-Key, Item Type=IC, Manufacturer Part Number=AP63203WU-7, Pricing="3000=0.34, 6000=0.335, 9000=0.33, 12000=0.33, 15000=0.32 (USD)", RoHS=Yes, Stock=3000, Supplier="Future Electronics"
U3: "NO Step-down type 1 Step-down 1V~29.4V 7V~42V 3A 300kHz SOIC-8_EP_150mil DC-DC Converters ROHS", Manufacturer="ROHM Semicon", ComponentLink1Description=LCSC, ComponentLink1URL=https://www.lcsc.com/product-detail/DC-DC-Converters_ROHM-Semicon-BD9876AEFJ-E2_C79958.html, Manufacturer Part Number=BD9876AEFJ-E2
U4: "IC REG CHARGE PUMP 5V 140MA 6SON", Case/Package=SON, Manufacturer="Texas Instruments", Max Input Voltage=5.5V, Max Operating Temperature=85°C, Max Output Current=140mA, Max Output Voltage=5.2V, Min Input Voltage=2.7V, Min Operating Temperature=-40°C, Min Output Voltage=4.8V, Nominal Output Voltage=5V, Nominal Supply Current=90uA, Package Quantity=1, Quiescent Current=4.7mA, Supplier Part Number 1=296-24054-6-ND, Switching Frequency=1.5MHz, Category="Voltage Regulators - Switching", ComponentLink1Description=https://datasheet.ciiva.com/15114/getdatasheetpartid-358100-15114131.pdf?src-supplier=Verical, ComponentLink1URL=https://datasheet.ciiva.com/15114/getdatasheetpartid-358100-15114131.pdf?src-supplier=Verical, ComponentLink2Description=https://datasheet.ciiva.com/4874/slvs888b-120916-4874885.pdf?src-supplier=Mouser, ComponentLink2URL=https://datasheet.ciiva.com/4874/slvs888b-120916-4874885.pdf?src-supplier=Mouser, ComponentLink3Description=https://datasheet.ciiva.com/26902/tps60150drvr-26902693.pdf?src-supplier=IIIC, ComponentLink3URL=https://datasheet.ciiva.com/26902/tps60150drvr-26902693.pdf?src-supplier=IIIC, ComponentLink4Description=https://datasheet.ciiva.com/41462/001014874-da-01-en-ic-reg-switched-tps60150drvr-wson-6-tid-41462718.pdf?src-supplier=Conrad, ComponentLink4URL=https://datasheet.ciiva.com/41462/001014874-da-01-en-ic-reg-switched-tps60150drvr-wson-6-tid-41462718.pdf?src-supplier=Conrad, ComponentLink5Description=https://datasheet.ciiva.com/22669/1828381-22669637.pdf?src-supplier=Element14, ComponentLink5URL=https://datasheet.ciiva.com/22669/1828381-22669637.pdf?src-supplier=Element14, ComponentLink6Description=https://datasheet.ciiva.com/2025/tps60150-2025302.pdf?src-supplier=Digi-Key, ComponentLink6URL=https://datasheet.ciiva.com/2025/tps60150-2025302.pdf?src-supplier=Digi-Key, ComponentLink7Description=https://datasheet.ciiva.com/2025/tps60150-2025303.pdf?src-supplier=Digi-Key, ComponentLink7URL=https://datasheet.ciiva.com/2025/tps60150-2025303.pdf?src-supplier=Digi-Key, ComponentLink8Description=https://datasheet.ciiva.com/2025/tps60150-2025304.pdf?src-supplier=Digi-Key, ComponentLink8URL=https://datasheet.ciiva.com/2025/tps60150-2025304.pdf?src-supplier=Digi-Key, ComponentLink9Description=https://datasheet.ciiva.com/46382/1828381-46382472.pdf?src-supplier=Element14, ComponentLink9URL=https://datasheet.ciiva.com/46382/1828381-46382472.pdf?src-supplier=Element14, ComponentLink10Description=https://datasheet.ciiva.com/3215/tps60150-3215851.pdf?src-supplier=Avnet, ComponentLink10URL=https://datasheet.ciiva.com/3215/tps60150-3215851.pdf?src-supplier=Avnet, ComponentLink11Description=https://datasheet.ciiva.com/14320/tps60150-14320303.pdf?src-supplier=Avnet, ComponentLink11URL=https://datasheet.ciiva.com/14320/tps60150-14320303.pdf?src-supplier=Avnet, Contact Plating=Gold, Lead Free="Lead Free", Manufacturer Part Number=TPS60150DRVR, Max Supply Voltage=5.5V, Min Supply Voltage=2.7V, Number of Outputs=1, Number of Pins=6, Output Current=140mA, Output Type=Fixed, Output Voltage=5V, Packaging="Tape and Reel", Pricing 1="1=1.69000, 10=1.51400, 25=1.42840, 100=1.21700, 250=1.14268, 500=0.99984, 1000=0.94325 (USD)", Radiation Hardening=No, REACH SVHC="No SVHC", RoHS=Yes, RoHS Compliant=Yes, Series=-, Supplier 1=Digi-Key, Supply Current=90uA, Synchronous Rectifier=No, Topology=Boost